# Altium PCB STAND_SSD_2246(CPU).PcbDoc (part 4 of 7)
Units mm, origin at the board's own origin, x right, y up, seen from the top; angles counter-clockwise.
Board outline 70 x 170 mm, 8 copper layers (L1:Top, L2:GND, L3:Sig, L4:VCC, L5:Sig, L6:Sig, L7:GND, L8:Bot), stack 1.112 mm thick; 174 components, 271 nets, 1671 pads, 771 vias.
Unrouted connection lines stored in the file: 138.
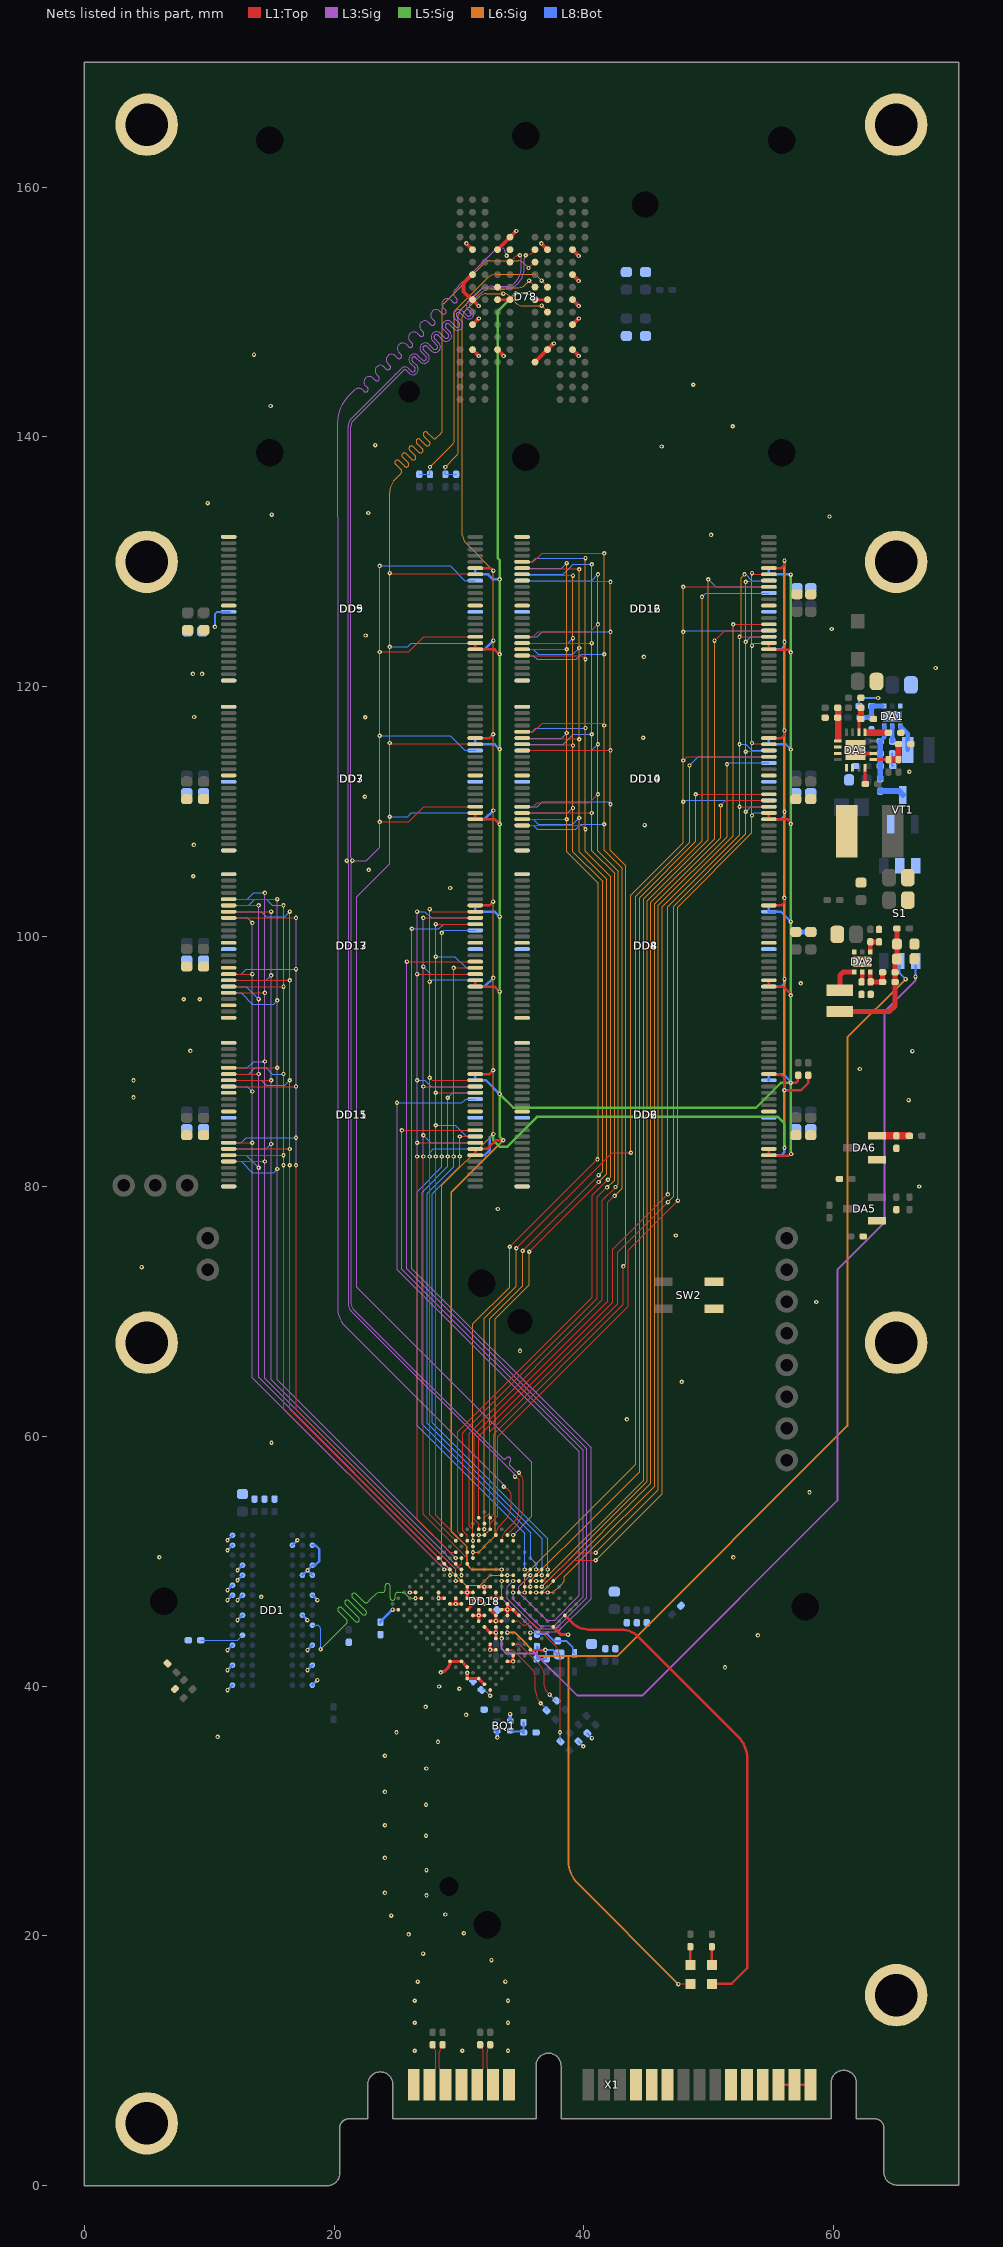
[diagram p10: the nets of this part, all layers, seen from the top]

## Via types
v1: diameter 0.35, hole 0.15, L1:Top to L8:Bot, tented both sides, 722 vias
v2: diameter 0.6, hole 0.3, L1:Top to L8:Bot, tented both sides, 45 vias
v3: diameter 0.6, hole 0.3, L1:Top to L8:Bot, tented bottom, 4 vias

## Nets (pads, with @x,y where several pads share a name; then routed paths per layer and width w, separated by ;. In a path a pad name is that pad's centre, name@x,y a point inside that pad or via, vN(x,y) a via of type N, cw(c..) or ccw(c..) an arc to the next point about the centre after c; other vN are vias at no path point) (continued)
F1DQS_P: D78.E5 DD18.T14 | length 126.6
  L1:Top w0.1: DD18.T14@32.959,52.095 ccw(c32.931,52.123) 32.971,52.123 32.971,52.199 cw(c33.847,52.199) 33.227,52.819 33.721,53.312 ccw(c32.626,54.407) 34.175,54.407 34.175,55.279 ccw(c33.687,55.279) 34.106,55.529 ccw(c33.687,55.279) 34.032,55.624 33.781,55.875 ccw(c33.748,55.842) 33.748,55.888 cw(c33.748,55.935) 33.716,55.902 33.7,55.917 ccw(c33.585,55.802) v1(33.585,55.965) ; v1(33.813,154.502) cw(c34.335,154.502) 33.966,154.871 D78.E5@34.088,154.993
  L3:Sig w0.1: 21.232,143.327 21.115,143.21 21.106,143.201 ccw(c23.063,141.245) 20.296,141.245 20.296,133.599 20.296,70.182 ccw(c22.16,70.182) 20.842,68.864 33.475,56.231 cw(c33.325,56.081) 33.537,56.081 ccw(c33.7,56.081) v1(33.585,55.965) ; 21.232,143.327 21.677,143.772 cw(c21.981,143.468) 22.286,143.772 22.403,143.654 ccw(c22.545,143.795) 22.686,143.937 ; 22.686,143.938 22.521,144.103 cw(c22.824,144.408) 23.09,144.745 23.094,144.745 23.294,144.545 ccw(c23.436,144.686) 23.577,144.828 23.412,144.994 cw(c23.715,145.299) 23.981,145.636 23.985,145.636 24.185,145.436 ccw(c24.327,145.577) 24.468,145.719 ; 24.468,145.72 24.303,145.885 cw(c24.606,146.19) 24.872,146.527 24.876,146.527 25.076,146.327 ccw(c25.218,146.468) 25.359,146.61 ; 25.359,146.611 25.194,146.776 cw(c25.497,147.081) 25.763,147.418 25.767,147.418 25.967,147.218 ccw(c26.109,147.359) 26.25,147.501 26.085,147.667 cw(c26.388,147.971) 26.654,148.309 26.658,148.309 26.858,148.109 ; 26.858,148.109 ccw(c27,148.25) 27.141,148.392 ; 27.141,148.392 26.976,148.558 cw(c27.279,148.862) 27.545,149.2 27.549,149.2 27.749,149 ccw(c27.891,149.141) 28.032,149.283 27.866,149.449 cw(c28.17,149.753) 28.436,150.091 28.44,150.091 28.64,149.891 ccw(c28.782,150.032) 28.923,150.174 ; 28.923,150.174 28.757,150.339 cw(c29.061,150.644) 29.327,150.982 29.331,150.982 29.531,150.782 ccw(c29.673,150.923) 29.814,151.065 29.697,151.182 cw(c30,151.487) 29.696,151.792 ; 29.696,151.792 30.279,152.374 ; 30.279,152.374 30.396,152.491 30.503,152.598 32.933,155.028 cw(c33.27,154.692) 33.27,155.168 33.321,155.168 cw(c33.321,154.785) 33.592,155.055 33.594,155.053 cw(c33.331,154.79) 33.703,154.79 33.703,154.731 ccw(c33.828,154.731) 33.74,154.643 33.765,154.617 cw(c33.65,154.502) v1(33.813,154.502)
F1REN_N: D78.F5 DD18.T13 | length 126.6
  L1:Top w0.1: DD18.T13@33.419,51.635 cw(c34.552,51.635) 33.75,52.436 34.279,52.964 ccw(c32.907,54.336) 34.847,54.336 34.847,56.394 ccw(c34.55,56.394) 34.76,56.604 34.686,56.677 ; D78.F5@34.088,153.993 34.48,154.385 cw(c34.876,153.989) v1(34.876,154.548) ; v1(34.49,56.768) cw(c34.49,56.604) 34.605,56.72 34.621,56.705 ccw(c34.654,56.737) 34.654,56.691 cw(c34.654,56.645) 34.686,56.678
  L3:Sig w0.1: 25.974,145.475 25.94,145.508 25.936,145.508 ccw(c25.67,145.17) 25.366,145.474 24.921,145.029 24.804,144.912 21.399,141.507 ccw(c22.052,140.853) 21.128,140.853 21.128,106.34 cw(c20.94,106.34) 21.073,106.207 21.066,106.2 ccw(c21.181,106.084) v1(21.018,106.084) ccw(c21.181,106.084) 21.066,105.969 cw(c20.916,105.819) 21.128,105.826 cw(c20.916,105.819) 21.128,105.819 21.128,70.605 ccw(c21.899,70.605) 21.354,70.059 34.38,57.033 cw(c34.23,56.883) 34.442,56.883 ccw(c34.605,56.883) v1(34.49,56.768) ; 25.974,145.474 26.171,145.277 ccw(c26.312,145.419) 26.453,145.561 26.113,145.9 ; 26.113,145.901 cw(c26.417,146.205) 26.112,146.509 cw(c26.417,146.205) 26.683,146.543 26.687,146.543 26.72,146.51 ; 26.721,146.509 27.062,146.168 ccw(c27.203,146.31) 27.344,146.168 ; 27.345,146.169 ccw(c27.203,146.31) 27.344,146.452 27.004,146.791 cw(c27.307,147.096) 27.574,147.434 27.578,147.434 27.611,147.401 ; 27.612,147.4 27.953,147.059 ccw(c28.094,147.201) 28.235,147.059 ccw(c28.094,147.201) 28.235,147.343 27.895,147.682 ; 27.895,147.683 cw(c28.198,147.987) 27.894,148.291 cw(c28.198,147.987) 28.465,148.325 28.469,148.325 28.502,148.292 ; 28.503,148.291 28.844,147.95 ccw(c28.985,148.092) 29.126,148.234 28.786,148.573 cw(c29.089,148.878) 28.785,149.182 cw(c29.089,148.878) 29.356,149.216 29.36,149.216 29.393,149.183 ; 29.394,149.182 29.735,148.841 ccw(c29.876,148.983) 30.017,148.841 ccw(c29.876,148.983) 30.017,149.125 ; 30.016,149.125 29.677,149.464 cw(c29.98,149.769) 29.676,150.073 cw(c29.98,149.769) 30.246,150.107 30.251,150.107 30.284,150.074 ; 30.285,150.073 30.626,149.732 ccw(c30.767,149.874) 30.907,150.016 30.712,150.211 cw(c31.016,150.516) 30.712,150.82 31.233,151.341 ; 31.234,151.342 31.35,151.458 31.433,151.542 cw(c32.689,150.286) 32.689,152.062 33.639,152.062 ccw(c33.639,153.329) 34.535,152.433 ccw(c33.423,153.545) 34.996,153.545 34.996,154.258 ccw(c34.738,154.258) 34.92,154.44 cw(c35.029,154.548) v1(34.876,154.548)
F1REN_P: D78.E7 DD3.8 DD5.8 DD7.8 DD9.8 DD18.U13 | length 184.4
  L1:Top w0.1: v1(23.659,109.186) 25.978,109.186 27.191,110.4 DD3.8@31.309,110.4 ; v1(23.659,122.786) 25.978,122.786 27.191,124 DD5.8@31.309,124 ; DD18.U13@33.858,52.12 34.431,52.693 34.491,52.753 ccw(c32.909,54.335) 35.147,54.335 35.147,56.456 ccw(c34.7,56.456) 35.016,56.772 34.898,56.89 cw(c34.931,56.922) 34.885,56.922 ccw(c34.839,56.922) 34.871,56.955 34.856,56.97 cw(c34.971,57.086) v1(34.808,57.086) ; v1(35.346,154.548) ccw(c35.346,155.267) 35.854,154.759 D78.E7@36.088,154.993
  L3:Sig w0.1: v1(23.645,129.684) v1(23.645,116.084) 23.645,107.164 22.565,106.084 v1(21.468,106.084) ; 26.275,146.346 ccw(c26.417,146.205) 26.274,146.065 26.616,145.723 ; 26.275,146.347 cw(c26.417,146.205) 26.559,146.346 26.898,146.007 ccw(c27.203,146.31) 27.507,146.006 ccw(c27.203,146.31) 27.541,146.576 27.541,146.58 27.508,146.613 ; 26.617,145.723 26.65,145.689 26.65,145.685 cw(c26.312,145.419) 26.007,145.116 25.812,145.31 ccw(c25.67,145.17) 25.528,145.311 25.083,144.866 24.966,144.749 21.563,141.346 ccw(c22.057,140.851) 21.358,140.851 21.358,106.34 ccw(c21.546,106.34) 21.413,106.207 21.42,106.2 cw(c21.304,106.084) v1(21.468,106.084) ; 27.45,147.237 ccw(c27.307,147.096) 27.165,146.956 27.507,146.614 ; 27.45,147.237 27.789,146.898 ; 27.789,146.897 ccw(c28.094,147.201) 28.398,146.897 ccw(c28.094,147.201) 28.432,147.467 28.432,147.471 28.398,147.504 ; 28.057,148.128 ccw(c28.198,147.987) 28.056,147.847 28.398,147.505 ; 28.057,148.129 cw(c28.198,147.987) 28.341,148.128 28.68,147.789 ccw(c28.985,148.092) 29.323,148.358 29.323,148.362 29.289,148.395 ; 28.948,149.019 ccw(c29.089,148.878) 28.947,148.737 29.289,148.396 ; 28.948,149.02 cw(c29.089,148.878) 29.232,149.019 ; 29.232,149.019 29.571,148.68 ; 29.571,148.679 ccw(c29.876,148.983) 30.18,148.679 ccw(c29.876,148.983) 30.214,149.249 30.214,149.253 30.18,149.286 ; 29.839,149.91 ccw(c29.98,149.769) 29.838,149.628 30.18,149.287 ; 29.839,149.911 cw(c29.98,149.769) 30.123,149.91 30.462,149.57 ccw(c30.767,149.874) 31.105,150.14 31.105,150.144 31.071,150.177 ; 31.07,150.178 30.875,150.374 cw(c31.016,150.516) 30.875,150.658 31.396,151.179 ; 31.396,151.179 31.513,151.296 31.594,151.377 cw(c32.692,150.279) 32.692,151.832 33.64,151.832 ccw(c33.64,153.326) 34.697,152.269 34.701,152.273 ccw(c33.433,153.541) 35.226,153.541 35.226,154.258 cw(c35.483,154.258) 35.301,154.44 ccw(c35.193,154.548) v1(35.346,154.548) ; v1(34.808,57.086) ccw(c34.693,56.97) 34.693,57.134 cw(c34.693,57.346) 34.543,57.196 34.371,57.367 34.066,57.673 cw(c34.207,57.814) 34.066,57.956 34.1,57.99 ccw(c33.959,58.131) 34.1,58.273 ccw(c33.959,58.131) 33.817,58.273 33.783,58.238 cw(c33.642,58.38) 33.5,58.238 33.465,58.274 21.517,70.221 cw(c21.902,70.606) 21.358,70.606 21.358,105.819 cw(c21.57,105.819) 21.42,105.969 ccw(c21.304,106.084) v1(21.468,106.084)
  L8:Bot w0.1: v1(23.645,116.084) 29.295,116.084 30.479,114.9 DD7.8@31.309,114.9 ; v1(23.645,129.684) 29.295,129.684 30.479,128.5 DD9.8@31.309,128.5
F1WEN: D78.F7 DD3.18 DD5.18 DD7.18 DD9.18 DD18.U12 | length 153.3
  L1:Top w0.1: v1@24.449,129.06 DD5.18@31.199,129.06 ; v1@24.509,115.45 DD3.18@31.259,115.45 ; DD18.U12@34.338,51.635 v1(34.338,52.095) ; v1(35.57,153.526) D78.F7@36.037,153.993
  L3:Sig w0.1: v1(24.459,129.1) v1(24.459,123.2) 24.459,105.843 21.819,103.203 21.819,71.927 35.835,57.911 35.835,53.592 v1(34.338,52.095)
  L6:Sig w0.1: v1(24.459,129.1) 24.459,135.588 cw(c25.9,135.588) 24.881,136.607 25.327,137.053 25.363,137.089 ccw(c25.221,137.23) 25.363,137.371 24.924,137.811 cw(c25.065,137.952) 24.924,138.093 cw(c25.065,137.952) 25.206,138.093 25.651,137.648 ccw(c25.793,137.79) 25.934,137.648 ccw(c25.793,137.79) 25.934,137.931 25.489,138.376 cw(c25.631,138.518) 25.489,138.659 cw(c25.631,138.518) 25.772,138.659 26.217,138.214 ccw(c26.359,138.355) 26.5,138.214 ccw(c26.359,138.355) 26.5,138.497 26.055,138.942 cw(c26.196,139.083) 26.055,139.225 cw(c26.196,139.083) 26.338,139.225 26.783,138.78 ccw(c26.924,138.921) 27.066,138.78 ccw(c26.924,138.921) 27.066,139.063 26.621,139.508 cw(c26.762,139.649) 26.621,139.791 cw(c26.762,139.649) 26.903,139.791 27.349,139.345 ccw(c27.49,139.487) 27.631,139.345 ccw(c27.49,139.487) 27.631,139.628 27.186,140.073 cw(c27.328,140.215) 27.186,140.356 cw(c27.328,140.215) 27.469,140.356 27.908,139.917 ccw(c28.05,140.058) 28.191,139.917 28.529,140.255 28.557,140.283 ccw(c28.296,140.545) 28.666,140.545 28.666,150.349 cw(c29.173,150.349) 28.814,150.708 32.03,153.924 cw(c32.468,153.486) 32.468,154.105 34.759,154.105 cw(c34.759,153.546) 35.154,153.941 v1(35.57,153.526)
  L8:Bot w0.1: v1(24.459,109.6) 25.884,109.6 26.184,109.9 DD7.18@31.309,109.9 ; v1(24.459,123.2) 25.884,123.2 26.184,123.5 DD9.18@31.309,123.5
  other v1: 24.459,115.5
F2ALE: DD10.17 DD12.17 DD14.17 DD16.17 DD18.T16 | length 91.6
  L1:Top w0.1: DD18.T16@32.04,53.014 32.04,53.474 32.453,53.887 32.453,60.362 42.708,70.616 42.708,74.735 v1(46.721,78.748) ; v1@52.999,128.43 DD12.17@54.754,128.43 ; v1@53.019,114.84 DD10.17@54.774,114.84
  L6:Sig w0.1: v1(46.721,78.748) 47.184,79.21 47.184,102.449 52.959,108.224 v1(52.959,114.8) v1(52.959,123.6) v1(52.959,128.4)
  L8:Bot w0.1: v1(52.959,110) 53.359,110.4 DD14.17@54.814,110.4 ; v1(52.959,123.6) 53.359,124 DD16.17@54.814,124
F2CE0: DD10.9 DD18.R5 | length 73.5
  L1:Top w0.1: DD18.R5@36.636,47.499 v1(37.096,47.499) ; v1(50.959,110.5) 51.359,110.9 DD10.9@54.814,110.9
  L6:Sig w0.1: v1(37.096,47.499) 37.555,47.499 38.149,48.093 38.436,48.379 38.436,48.776 40.84,51.179 45.665,56.004 45.665,102.627 50.959,107.921 v1(50.959,110.5)
F2CE1: DD12.9 DD18.P6 | length 87.5
  L1:Top w0.1: DD18.P6@35.717,47.499 v1(36.176,47.499) ; v1(50.459,123.7) 51.259,124.5 DD12.9@54.814,124.5
  L6:Sig w0.1: v1(36.176,47.499) 36.636,47.499 37.69,48.552 45.369,56.231 45.369,102.755 50.459,107.846 v1(50.459,123.7)
F2CE2: DD10.10 DD18.P7 | length 75.2
  L1:Top w0.1: DD18.P7@35.257,47.958 35.718,47.958 v1(35.72,47.96) ; v1(48.959,111.4) DD10.10@54.814,111.4
  L6:Sig w0.1: v1(35.72,47.96) 35.717,47.963 35.717,48.418 36.961,49.662 39.778,52.479 44.462,57.163 44.462,103.122 48.959,107.618 v1(48.959,111.4)
F2CE3: DD12.10 DD18.U5 | length 86.4
  L1:Top w0.1: DD18.U5@37.555,48.418 38.093,48.955 39.217,50.079 v1(40.94,50.079) ; v1(51.959,125) DD12.10@54.814,125
  L6:Sig w0.1: v1(40.94,50.079) 46.269,55.409 46.269,102.383 51.959,108.073 v1(51.959,125)
F2CE4: DD14.9 DD18.N7 | length 78.8
  L1:Top w0.1: DD18.N7@34.797,47.499 v1(35.257,47.499)
  L6:Sig w0.1: v1(35.257,47.499) 35.257,48.878 35.334,48.954 44.149,57.769 44.149,103.232 48.459,107.543 v1(48.459,113.7)
  L8:Bot w0.1: v1(48.459,113.7) 49.159,114.4 DD14.9@54.814,114.4
F2CE5: DD16.9 DD18.R6 | length 91.7
  L1:Top w0.1: DD18.R6@36.176,47.958 v1(36.636,47.958)
  L6:Sig w0.1: v1(36.636,47.958) 38.12,49.443 38.174,49.496 40.557,51.879 45.065,56.387 45.065,102.876 49.959,107.77 v1(49.959,128.6)
  L8:Bot w0.1: v1(49.959,128.6) 50.559,128 DD16.9@54.814,128
F2CE6: DD14.10 DD18.T6 | length 76.1
  L1:Top w0.1: DD18.T6@36.636,48.418 37.096,48.418 37.863,49.185 38.174,49.496 39.357,50.679 v1(40.94,50.679)
  L6:Sig w0.1: v1(40.94,50.679) 40.921,50.679 45.967,55.726 45.967,102.505 51.459,107.997 v1(51.459,113.8)
  L8:Bot w0.1: v1(51.459,113.8) 51.559,113.9 DD14.10@54.814,113.9
F2CE7: DD16.10 DD18.R7 | length 90.5
  L1:Top w0.1: DD18.R7@35.717,48.418 v1(36.177,48.417)
  L6:Sig w0.1: v1(36.177,48.417) 36.695,48.418 44.777,56.5 44.777,103.012 49.459,107.694 v1(49.459,127.2)
  L8:Bot w0.1: v1(49.459,127.2) 49.759,127.5 DD16.10@54.814,127.5
F2CLE: DD10.16 DD12.16 DD14.16 DD16.16 DD18.R15 | length 111
  L1:Top w0.1: v1(32.036,52.559) 32.036,52.099 DD18.R15@32.04,52.095 ; v1@34.602,75.043 42.259,82.7 v1(43.759,82.7) ; v1(47.959,114.1) 48.259,114.4 DD10.16@54.814,114.4 ; v1(47.959,128) DD12.16@54.814,128
  L6:Sig w0.1: v1(32.036,52.559) 32.042,52.559 32.042,69.469 34.595,72.022 v1(34.595,75.051) ; v1(43.759,82.7) 43.759,103.299 47.959,107.499 v1(47.959,124.4) v1(47.959,128)
  L8:Bot w0.1: v1(47.959,110.8) 48.059,110.9 DD14.16@54.814,110.9 ; v1(47.959,124.4) 48.059,124.5 DD16.16@54.814,124.5
F2D0: DD10.29 DD12.29 DD14.29 DD16.29 DD18.R16 | length 111.3
  L1:Top w0.1: DD18.R16@31.58,52.554 31.58,53.014 31.22,53.374 31.22,60.113 41.912,70.804 41.912,78.723 v1@42.451,79.262 ; DD10.29@35.064,116.4 35.959,116.4 36.659,117.1 41.429,117.1 v1(41.629,116.9) ; DD12.29@35.064,130 35.959,130 36.659,130.7 v1@41.629,130.7
  L6:Sig w0.1: v1(41.629,130.68) v1(41.629,122.6) 41.629,106.896 43.068,105.457 43.068,79.856 v1(42.463,79.251)
  L8:Bot w0.1: DD14.29@35.064,108.9 35.959,108.9 36.259,108.6 39.368,108.6 39.768,109 v1(41.629,109) ; DD16.29@35.064,122.5 35.959,122.5 36.259,122.2 39.377,122.2 39.777,122.6 v1(41.629,122.6)
F2D1: DD10.30 DD12.30 DD14.30 DD16.30 DD18.M14 | length 103.7
  L1:Top w0.1: DD18.M14@31.12,50.256 v1(31.12,50.716) ; DD10.30@35.064,115.9 DD10.30@35.089,115.875 ; DD12.30@35.064,129.5 DD12.30@35.089,129.475 ; DD10.30@35.089,115.825 v1@39.629,115.825 ; DD12.30@35.089,129.445 v1@39.629,129.445 ; v1@35.64,74.781 v1@41.159,80.3
  L6:Sig w0.1: v1(31.12,50.716) 31.58,50.716 31.905,51.041 32.365,51.501 32.365,51.509 32.904,52.048 32.904,69.421 35.632,72.149 v1(35.632,74.774) ; v1(39.629,129.4) v1(39.629,123.1) 39.629,106.79 41.821,104.598 41.821,80.998 v1(41.183,80.36)
  L8:Bot w0.1: DD14.30@35.064,109.4 35.959,109.4 36.359,109 39.129,109 v1(39.629,109.5) ; DD16.30@35.064,123 35.959,123 36.359,122.6 39.129,122.6 v1(39.629,123.1)
  other v1: 39.629,115.8
F2D2: DD10.31 DD12.31 DD14.31 DD16.31 DD18.P15 | length 99.2
  L1:Top w0.1: DD18.P15@31.58,51.635 v1(31.58,52.095) ; DD12.31@35.064,128.94 v1@39.129,128.94 ; DD10.31@35.094,115.35 v1@39.141,115.35 ; v1@35.106,74.847 41.173,80.913 v1@41.159,80.913
  L6:Sig w0.1: v1(31.58,52.095) 32.032,52.095 32.455,52.519 32.455,69.395 35.1,72.039 v1(35.1,74.853) ; v1(39.129,128.9) v1(39.129,123.9) 39.129,106.793 41.498,104.424 41.498,81.227 v1(41.183,80.912)
  L8:Bot w0.1: DD14.31@35.064,109.9 38.729,109.9 v1(39.129,110.3) ; DD16.31@35.064,123.5 38.729,123.5 v1(39.129,123.9)
  other v1: 39.129,115.3
F2D3: DD10.32 DD12.32 DD14.32 DD16.32 DD18.U16 | length 108.7
  L1:Top w0.1: DD18.U16@32.499,53.474 32.784,53.758 32.784,60.181 43.159,70.556 v1(43.159,73.6) ; DD10.32@35.064,114.9 v1@42.171,114.9 ; DD12.32@35.064,128.45 v1@42.155,128.45
  L6:Sig w0.1: v1@42.129,124.37 v1(42.129,128.4) ; v1(42.129,124.4) v1(42.129,114.91) v1(42.129,110.6) 42.129,106.904 43.359,105.674 43.359,73.8 v1(43.159,73.6)
  L8:Bot w0.1: DD14.32@35.064,110.4 36.259,110.4 36.659,110.8 41.929,110.8 v1(42.129,110.6) ; DD16.32@35.064,124 36.259,124 36.659,124.4 v1(42.129,124.4)
F2D4: DD10.41 DD12.41 DD14.41 DD16.41 DD18.P16 | length 108.2
  L1:Top w0.1: DD18.P16@31.12,52.095 31.12,52.554 30.82,52.854 30.82,60.258 41.487,70.924 41.487,78.905 v1(42.534,79.952) ; DD10.41@35.064,110.4 35.959,110.4 36.259,110.7 40.429,110.7 v1(41.129,111.4) ; DD12.41@35.064,124 35.959,124 36.348,124.389 40.518,124.389 v1(41.129,125)
  L6:Sig w0.1: v1(41.129,129) v1(41.129,125) v1(41.129,111.4) 41.129,106.872 42.759,105.242 42.759,80.177 v1(42.534,79.952)
  L8:Bot w0.1: DD14.41@35.064,114.9 40.629,114.9 v1(41.129,115.4) ; DD16.41@35.064,128.5 40.629,128.5 v1(41.129,129)
F2D5: DD10.42 DD12.42 DD14.42 DD16.42 DD18.N16 | length 107
  L1:Top w0.1: DD18.N16@30.661,51.635 30.661,52.095 30.32,52.435 30.32,60.286 41.08,71.045 41.08,79.162 41.848,79.93 v1(41.864,79.93) ; DD10.42@35.064,109.9 v1(40.629,109.9) ; DD12.42@35.064,123.5 v1(40.629,123.5)
  L6:Sig w0.1: v1(40.629,129.8) v1(40.629,123.5) 40.629,106.88 42.453,105.056 42.453,80.508 41.876,79.93 v1(41.864,79.93)
  L8:Bot w0.1: DD14.42@35.064,115.4 38.367,115.4 39.167,116.2 v1(40.629,116.2) ; DD16.42@35.064,129 38.336,129 39.136,129.8 v1(40.629,129.8)
F2D6: DD10.43 DD12.43 DD14.43 DD16.43 DD18.N15 | length 98.5
  L1:Top w0.1: DD18.N15@31.12,51.176 v1(31.12,51.635) ; v1@34.073,75.165 v1@41.083,82.175 ; DD10.43@35.064,109.4 v1(38.629,109.4) ; DD12.43@35.064,123 v1(38.629,123)
  L6:Sig w0.1: v1(31.12,51.635) 31.12,68.998 34.068,71.945 v1(34.068,75.171) ; v1(38.629,129.9) v1(38.629,123) 38.629,106.78 41.137,104.272 v1@41.137,82.173
  L8:Bot w0.1: DD14.43@35.064,115.9 38.229,115.9 v1(38.629,116.3) ; DD16.43@35.064,129.5 38.229,129.5 v1(38.629,129.9)
  other v1: 41.086,82.173
F2D7: DD10.44 DD12.44 DD14.44 DD16.44 DD18.N17 | length 105
  L1:Top w0.1: DD18.N17@30.201,52.095 29.92,52.376 29.92,60.381 40.683,71.143 40.683,79.293 v1@41.959,80.57 ; DD10.44@35.064,108.9 39.829,108.9 v1(40.129,108.6) ; DD12.44@35.064,122.5 39.829,122.5 v1(40.129,122.2)
  L6:Sig w0.1: v1(40.129,130.3) v1(40.129,122.2) v1(40.129,108.6) 40.129,106.819 42.144,104.804 42.144,80.759 v1(41.926,80.541)
  L8:Bot w0.1: DD14.44@35.064,116.4 35.859,116.4 36.159,116.7 v1(40.129,116.7) ; DD16.44@35.064,130 35.859,130 36.159,130.3 v1(40.129,130.3)
F2REN_P: DD10.8 DD12.8 DD14.8 DD16.8 DD18.T17 | length 94.1
  L1:Top w0.1: DD18.T17@31.58,53.474 31.58,60.014 42.314,70.748 42.314,74.987 v1@46.705,79.377 ; v1(52.459,110.4) DD10.8@54.814,110.4 ; v1(52.459,124) DD12.8@54.814,124
  L6:Sig w0.1: v1(46.721,79.362) 46.721,102.41 52.459,108.149 v1(52.459,124) 52.584,124.125 52.584,128.725 v1(52.859,129)
  L8:Bot w0.1: v1(52.459,115.4) 52.959,115.4 53.459,114.9 DD14.8@54.814,114.9 ; v1(52.859,129) 52.759,129 52.859,129.1 53.459,128.5 DD16.8@54.814,128.5
F2WEN: DD10.18 DD12.18 DD14.18 DD16.18 DD18.T15 | length 90.7
  L1:Top w0.1: DD18.T15@32.499,52.554 32.499,53.042 33.09,53.633 33.09,59.951 43.543,70.404 43.543,74.9 v1@47.517,78.874 ; v1(53.459,129.1) 53.559,129 DD12.18@54.814,129 ; v1@53.519,115.44 DD10.18@54.774,115.44
  L6:Sig w0.1: v1@47.528,78.876 47.528,102.368 53.459,108.3 v1(53.459,123.3) v1(53.459,129.1)
  L8:Bot w0.1: v1(53.459,109.7) 53.659,109.9 DD14.18@54.814,109.9 ; v1(53.459,123.3) 53.659,123.5 DD16.18@54.814,123.5
  other v1: 47.521,78.869 53.459,115.5
F3ALE: DD11.17 DD13.17 DD15.17 DD17.17 DD18.L14 | length 70.3
  L1:Top w0.1: v1(27.154,82.4) 27.154,53.763 30.661,50.256 DD18.L14@30.661,49.797 ; v1(27.154,88) DD11.17@31.309,88 ; v1(27.154,101.5) DD13.17@31.309,101.5
  L3:Sig w0.1: v1(27.154,82.4) v1(27.154,88) v1(27.154,97.6) v1(27.154,101.5)
  L8:Bot w0.1: v1(27.154,84.1) 27.754,83.5 DD15.17@31.309,83.5 ; v1(27.154,97.6) 27.754,97 DD17.17@31.309,97
F3CE0: DD11.9 DD18.U6 | length 41.2
  L1:Top w0.1: v1@30.034,84 DD11.9@31.309,84 ; DD18.U6@37.096,48.877 v1(37.096,49.337)
  L3:Sig w0.1: v1(30.059,82.4) v1(30.059,84)
  L8:Bot w0.1: v1(30.059,82.4) 30.067,82.392 30.067,81.635 27.85,79.417 27.85,61.092 37.126,51.816 v1@37.126,49.306
F3CE1: DD13.9 DD18.T7 | length 55.5
  L1:Top w0.1: v1(29.574,97.5) DD13.9@31.309,97.5 ; DD18.T7@36.176,48.877 v1(36.636,48.877)
  L3:Sig w0.1: v1(29.574,82.4) v1(29.574,97.5)
  L8:Bot w0.1: v1(29.574,82.4) 29.574,81.58 27.453,79.459 27.453,61.029 36.667,51.816 36.667,48.907 v1(36.636,48.877)
F3CE2: DD11.10 DD18.N8 | length 57.6
  L1:Top w0.1: v1@25.434,84.5 DD11.10@31.309,84.5 ; v1(34.338,47.499) DD18.N8@34.338,47.958
  L3:Sig w0.1: v1(25.434,84.49) 25.434,73.377 39.931,58.88 39.931,47.154 37.62,44.843 36.458,44.843 34.338,46.963 v1(34.338,47.499)
F3CE3: DD13.10 DD18.P8 | length 72.9
  L1:Top w0.1: v1(25.829,98) DD13.10@31.309,98 ; v1(34.338,48.418) DD18.P8@34.797,48.418
  L3:Sig w0.1: v1(25.829,98) 25.829,73.417 40.248,58.998 40.248,47.07 37.761,44.583 36.28,44.583 33.878,46.985 33.878,47.958 v1(34.338,48.418)
F3CE4: DD15.9 DD18.U7 | length 45.2
  L1:Top w0.1: v1(36.176,49.337) DD18.U7@36.636,49.337
  L3:Sig w0.1: v1(29.104,82.4) v1(29.104,87.1)
  L8:Bot w0.1: v1(29.104,82.4) 29.104,81.599 27.053,79.548 27.053,60.97 35.747,52.275 35.747,50.226 36.176,49.797 v1(36.176,49.337) ; v1(29.104,87.1) 29.504,87.5 DD15.9@31.309,87.5
F3CE5: DD17.9 DD18.N9 | length 76
  L1:Top w0.1: v1(33.419,48.418) DD18.N9@33.878,48.418
  L3:Sig w0.1: v1(26.229,100.635) 26.229,73.427 40.585,59.071 40.585,47.008 37.92,44.343 36.115,44.343 33.419,47.039 v1(33.419,48.418)
  L8:Bot w0.1: v1@26.229,100.625 28.394,100.625 28.769,101 DD17.9@31.309,101
F3CE6: DD15.10 DD18.R8 | length 60.6
  L1:Top w0.1: DD18.R8@35.257,48.877 v1(35.717,48.877)
  L3:Sig w0.1: v1(25.044,86.7) 25.044,73.343 39.637,58.75 39.637,47.256 37.661,45.281 37.015,45.281 36.501,45.795 35.851,46.445 35.582,46.714 35.392,46.904 35.122,47.174 34.797,47.499 34.797,47.958 35.62,48.781 v1@35.62,48.843
  L8:Bot w0.1: v1(25.044,86.7) 30.241,86.7 30.541,87 DD15.10@31.309,87
F3CE7: DD17.10 DD18.T8 | length 58.6
  L1:Top w0.1: v1(35.257,49.337) DD18.T8@35.717,49.337
  L3:Sig w0.1: v1(28.624,82.4) v1(28.624,100.3)
  L8:Bot w0.1: v1(28.624,82.4) 28.624,81.558 26.648,79.582 26.648,60.854 35.257,52.245 v1(35.257,49.337) ; v1(28.624,100.3) 28.824,100.5 DD17.10@31.309,100.5
F3CLE: DD11.16 DD13.16 DD15.16 DD17.16 DD18.M15 | length 64.8
  L1:Top w0.1: v1(28.144,82.4) 28.144,53.692 30.661,51.176 DD18.M15@30.661,50.716 ; v1(28.144,87.5) DD11.16@31.309,87.5 ; v1(28.144,101) DD13.16@31.309,101
  L3:Sig w0.1: v1@28.144,82.37 v1(28.144,82.4) v1(28.144,87.5) v1(28.144,98.4) v1(28.144,101)
  L8:Bot w0.1: v1(28.144,84.9) 29.692,84.9 30.592,84 DD15.16@31.309,84 ; v1(28.144,98.4) 29.675,98.4 30.575,97.5 DD17.16@31.309,97.5
F3D0: DD11.29 DD13.29 DD15.29 DD17.29 DD18.K15 | length 75.7
  L1:Top w0.1: DD11.29@11.559,89.5 v1(15.459,89.5) ; DD13.29@11.559,103 v1@15.459,103 ; DD18.K15@29.742,49.797 v1(29.742,50.256)
  L3:Sig w0.1: v1(15.459,103) v1(15.459,94.9) v1(15.459,81.4) 15.459,64.539 27.919,52.079 28.204,51.794 v1(29.742,50.256)
  L8:Bot w0.1: DD15.29@11.559,82 12.559,82 13.459,81.1 15.159,81.1 v1(15.459,81.4) ; DD17.29@11.559,95.5 12.559,95.5 13.459,94.6 15.159,94.6 v1(15.459,94.9)
F3D1: DD11.30 DD13.30 DD15.30 DD17.30 DD18.J14 | length 70.9
  L1:Top w0.1: DD11.30@11.559,89 v1(13.959,89) ; DD13.30@11.559,102.5 v1(13.959,102.5) ; v1(29.282,48.877) DD18.J14@29.742,48.877
  L3:Sig w0.1: v1(13.959,102.5) v1(13.959,95) v1(13.959,89) v1(13.959,81.5) 13.953,81.494 13.953,64.71 29.282,49.381 v1(29.282,48.877)
  L8:Bot w0.1: DD15.30@11.559,82.5 12.959,82.5 v1(13.959,81.5) ; DD17.30@11.559,96 12.959,96 v1(13.959,95)
F3D2: DD11.31 DD13.31 DD15.31 DD17.31 DD18.K14 | length 73.8
  L1:Top w0.1: DD11.31@11.559,88.5 v1(14.959,88.5) ; DD13.31@11.559,102 v1(14.959,102) ; v1(30.201,48.877) DD18.K14@30.201,49.337
  L3:Sig w0.1: v1(14.959,102) v1(14.959,96.9) v1(14.959,83.4) 14.959,64.531 27.711,51.779 30.201,49.289 v1(30.201,48.877)
  L8:Bot w0.1: DD15.31@11.559,83 14.559,83 v1(14.959,83.4) ; DD17.31@11.559,96.5 14.559,96.5 v1(14.959,96.9)
F3D3: DD11.32 DD13.32 DD15.32 DD17.32 DD18.L15 | length 80.4
  L1:Top w0.1: DD11.32@11.559,88 v1(16.959,88) ; DD13.32@11.559,101.5 v1(16.959,101.5) ; v1(16.959,81.7) 16.959,62.124 29.621,49.462 29.867,49.462 30.201,49.797 DD18.L15@30.201,50.256
  L3:Sig w0.1: v1(16.959,81.7) v1(16.959,83.9) v1(16.959,97.4) v1(16.959,101.5)
  L8:Bot w0.1: DD15.32@11.559,83.5 12.559,83.5 12.959,83.9 v1(16.959,83.9) ; DD17.32@11.559,97 12.559,97 12.959,97.4 v1(16.959,97.4)
F3D4: DD11.41 DD13.41 DD15.41 DD17.41 DD18.J15 | length 66.5
  L1:Top w0.1: DD11.41@11.559,83.5 v1(13.459,83.5) ; DD13.41@11.559,97 v1(13.459,97) ; v1(28.822,49.337) DD18.J15@29.282,49.337
  L3:Sig w0.1: v1(13.459,101.1) v1(13.459,97) v1(13.459,87.6) v1(13.459,83.5) 13.465,83.494 13.465,64.695 v1(28.822,49.337)
  L8:Bot w0.1: DD15.41@11.559,88 13.059,88 v1(13.459,87.6) ; DD17.41@11.559,101.5 13.059,101.5 v1(13.459,101.1)
F3D5: DD11.42 DD13.42 DD15.42 DD17.42 DD18.J17 | length 76.9
  L1:Top w0.1: DD11.42@11.559,83 v1(16.459,83) ; DD13.42@11.559,96.5 v1(16.459,96.5) ; v1(16.459,81.7) 16.459,62.16 DD18.J17@28.363,50.256
  L3:Sig w0.1: v1(16.459,81.7) v1(16.459,83) v1(16.459,96.5) v1(16.459,102)
  L8:Bot w0.1: DD15.42@11.559,88.5 14.159,88.5 14.559,88.1 16.059,88.1 v1(16.459,88.5) ; DD17.42@11.559,102 14.159,102 14.559,101.6 16.059,101.6 v1(16.459,102)
F3D6: DD11.43 DD13.43 DD15.43 DD17.43 DD18.J16 | length 76.7
  L1:Top w0.1: DD11.43@11.559,82.5 v1(15.959,82.5) ; DD13.43@11.559,96 v1(15.959,96) ; v1(15.959,81.7) 15.959,62.208 28.37,49.797 DD18.J16@28.822,49.797
  L3:Sig w0.1: v1(15.959,81.7) v1(15.959,82.5) v1(15.959,96) v1(15.959,102.5)
  L8:Bot w0.1: DD15.43@11.559,89 13.159,89 13.659,89.5 14.559,89.5 15.059,89 v1(15.959,89) ; DD17.43@11.559,102.5 13.159,102.5 13.659,103 14.559,103 15.059,102.5 v1(15.959,102.5)
F3D7: DD11.44 DD13.44 DD15.44 DD17.44 DD18.J13 | length 73.9
  L1:Top w0.1: DD11.44@11.559,82 v1(14.459,82) ; DD13.44@11.559,95.5 v1(14.459,95.5) ; v1(29.742,48.418) DD18.J13@30.201,48.418
  L3:Sig w0.1: v1(14.459,103.5) v1(14.459,95.5) v1(14.459,82) 14.459,64.631 27.611,51.479 27.75,51.34 27.856,51.235 29.742,49.349 v1(29.742,48.418)
  L8:Bot w0.1: DD15.44@11.559,89.5 13.059,89.5 13.559,90 v1(14.459,90) ; DD17.44@11.559,103 13.059,103 13.559,103.5 v1(14.459,103.5)
F3REN_P: DD11.8 DD13.8 DD15.8 DD17.8 DD18.L16 | length 72
  L1:Top w0.1: v1@26.556,83.5 DD11.8@31.309,83.5 ; v1(26.654,82.4) 26.654,53.344 29.283,50.716 DD18.L16@29.742,50.716 ; v1(26.654,97) DD13.8@31.309,97
  L3:Sig w0.1: v1(26.654,82.4) v1(26.654,97) v1(26.654,102)
  L8:Bot w0.1: v1(26.654,88.5) 27.269,88.5 27.769,88 DD15.8@31.309,88 ; v1(26.654,102) 27.263,102 27.763,101.5 DD17.8@31.309,101.5
  other v1: 26.654,83.5
F3WEN: DD11.18 DD13.18 DD15.18 DD17.18 DD18.M17 | length 66.5
  L1:Top w0.1: v1(27.654,82.4) 27.644,82.389 27.644,53.733 DD18.M17@29.742,51.635 ; v1(27.654,88.7) 27.854,88.5 DD11.18@31.309,88.5 ; v1(27.654,102.2) 27.854,102 DD13.18@31.309,102
  L3:Sig w0.1: v1(27.654,82.4) v1(27.654,96.4) v1(27.654,102.2)
  L8:Bot w0.1: v1(27.654,82.4) 27.654,82.704 27.95,83 DD15.18@31.309,83 ; v1(27.654,96.4) 27.677,96.4 27.838,96.561 DD17.18@31.05,96.561 ; DD17.18@31.271,96.538 DD17.18@31.309,96.5
FRB: D78.J4 D78.J5 D78.J7 D78.J8 DD2.6 DD2.7 DD3.6 DD3.7 DD4.6 DD4.7 DD5.6 DD5.7 DD6.6 DD6.7 DD7.6 DD7.7 DD8.6 DD8.7 DD9.6 DD9.7 DD10.6 DD10.7 DD11.6 DD11.7 DD12.6 DD12.7 DD13.6 DD13.7 DD14.6 DD14.7 DD15.6 DD15.7 DD16.6 DD16.7 DD17.6 DD17.7 DD18.N10 R26.1 | length 226
  L1:Top w0.1: DD18.N10@33.419,48.877 v1(33.419,49.337) ; D78.J5@34.088,151.044 v1(34.556,151.511) ; v1(35.621,151.511) D78.J7@36.088,151.044
  L1:Top w0.2: DD11.6@31.309,82.5 DD11.7@31.309,83 32.259,83 32.959,83.7 v1(33.559,83.7) ; DD13.7@31.309,96.5 DD13.6@31.309,96 32.859,96 v1(33.259,95.6) ; DD3.7@31.309,109.9 DD3.6@31.309,109.4 32.859,109.4 v1(33.259,109) ; DD5.7@31.309,123.5 DD5.6@31.309,123 32.859,123 v1(33.259,122.6) ; D78.J4@33.088,150.993 D78.J5@34.088,150.993 ; D78.J7@36.088,150.993 D78.J8@37.088,150.993 ; DD2.7@54.809,83 DD2.6@54.809,82.5 54.828,82.481 55.374,82.481 55.384,82.471 56.407,82.471 56.536,82.6 v1(56.59,82.6) ; DD4.7@54.809,96.5 DD4.6@54.809,96 55.959,96 56.559,95.4 v1(56.559,95.3) ; DD10.7@54.814,109.9 DD10.6@54.814,109.4 54.833,109.381 55.379,109.381 56.332,109.381 56.521,109.192 56.521,109.063 v1(56.559,109.025) ; DD12.7@54.814,123.5 DD12.6@54.814,123 54.833,122.981 55.379,122.981 55.394,122.966 56.342,122.966 56.554,122.754 v1(56.559,122.754) ; v1(56.559,88.3) 56.99,88.3 57.131,88.442 57.131,88.872 R26.1@57.159,88.9
  L5:Sig w0.2: v1(33.559,83.7) 33.259,84 v1(33.259,87.4) ; v1(35.621,151.511) v1(34.556,151.511) 33.112,150.068 33.112,130.281 33.259,130.134 v1(33.259,122.6) v1(33.259,115) v1(33.259,109) v1(33.259,101.6) v1(33.259,95.6) v1(33.259,87.4) ; v1(56.559,128.975) v1(56.559,122.754) v1(56.559,114.975) v1(56.559,109.025) v1(56.559,101.2) v1(56.559,95.3) v1(56.559,88.3) ; v1(56.59,82.6) 56.59,82.531 56.559,82.562 v1(56.559,88.3) ; v1(33.259,87.4) 34.359,86.3 53.777,86.3 55.777,88.3 v1(56.559,88.3)
  L6:Sig w0.15: v1(33.419,49.337) 31.038,49.337 30.62,49.755 30.62,51.177 29.383,52.414 29.383,79.524 v1(33.559,83.7)
  L8:Bot w0.2: DD15.6@31.309,89 DD15.7@31.309,88.5 32.159,88.5 v1(33.259,87.4) ; DD17.6@31.309,102.5 DD17.7@31.309,102 32.859,102 v1(33.259,101.6) ; DD7.6@31.309,115.9 DD7.7@31.309,115.4 32.859,115.4 v1(33.259,115) ; DD9.6@31.309,129.5 DD9.7@31.309,129 32.334,129 32.734,128.6 v1(33.259,128.6) ; DD6.7@54.814,88.5 DD6.6@54.814,89 55.959,89 56.559,88.4 v1(56.559,88.3) ; DD8.6@54.814,102.5 DD8.7@54.814,102 55.759,102 v1(56.559,101.2) ; DD14.6@54.814,115.9 DD14.7@54.814,115.4 56.163,115.4 56.559,115.004 v1(56.559,114.975) ; DD16.6@54.814,129.5 DD16.7@54.814,129 v1@56.459,129
FWP: D78.H4 D78.K8 DD2.19 DD3.19 DD4.19 DD5.19 DD6.19 DD7.19 DD8.19 DD9.19 DD10.19 DD11.19 DD12.19 DD13.19 DD14.19 DD15.19 DD16.19 DD17.19 DD18.P9 R25.1 | length 223.4
  L1:Top w0.1: D78.H4@33.088,151.942 v1(33.556,151.475) ; v1(33.878,48.878) DD18.P9@34.338,48.877 ; v1(36.621,150.511) D78.K8@37.088,150.044
  L1:Top w0.2: DD11.19@31.309,89 32.439,89 v1(32.739,89.3) ; DD13.19@31.309,102.5 32.439,102.5 v1(32.739,102.8) ; DD3.19@31.309,115.9 32.439,115.9 v1(32.739,116.2) ; DD5.19@31.309,129.5 32.54,129.5 32.74,129.3 v1(32.759,129.3) ; DD2.19@54.809,89 55.754,89 56.054,88.7 v1(56.054,87.7) 57.375,87.7 57.959,88.285 R25.1@57.959,88.9 ; DD4.19@54.809,102.5 55.801,102.5 56.054,102.754 v1(56.054,103.1) ; DD10.19@54.814,115.9 55.806,115.9 56.059,116.154 v1(56.059,116.5) ; DD12.19@54.814,129.5 55.806,129.5 56.059,129.754 v1(56.059,130.1)
  L5:Sig w0.2: v1(32.759,84.2) 32.759,83.689 33.278,83.171 33.831,83.171 36.236,85.575 55.527,85.575 56.059,85.043 v1(56.059,83.1)
  L6:Sig w0.1: v1(33.878,48.878) 32.499,48.878 31.687,48.066 30.554,48.066 28.642,49.977 28.642,80.083 32.459,83.9 v1(32.759,84.2) v1(32.759,123.7) v1(32.759,129.3) 30.541,131.518 cw(c31.17,132.147) 30.281,132.147 30.281,149.628 cw(c30.832,149.628) 30.442,150.017 31.709,151.284 cw(c32.169,150.823) 32.169,151.475 v1(33.556,151.475) 33.582,151.475 cw(c33.582,150.856) 34.02,151.294 34.646,150.668 ccw(c35.023,151.045) 35.023,150.511 v1(36.621,150.511) v1@36.621,150.536
  L6:Sig w0.2: v1(56.059,83.1) v1(56.059,96.6) v1(56.059,110) v1(56.059,123.6) v1(56.059,130.1)
  L8:Bot w0.2: DD15.19@31.309,82.5 32.059,82.5 32.483,82.924 32.483,83.924 v1(32.759,84.2) ; DD17.19@31.309,96 32.059,96 v1(32.759,96.7) ; DD7.19@31.309,109.4 32.059,109.4 v1(32.759,110.1) ; DD9.19@31.309,123 32.059,123 v1(32.759,123.7) ; DD6.19@54.814,82.5 55.806,82.5 56.059,82.754 v1(56.059,83.1) ; DD8.19@54.814,96 55.806,96 56.059,96.254 v1(56.059,96.6) ; DD14.19@54.814,109.4 55.806,109.4 56.059,109.654 v1(56.059,110) ; DD16.19@54.814,123 55.806,123 56.059,123.254 v1(56.059,123.6)
GND: BQ1.2 BQ1.4 C1.2 C2.2 C3.1 C4.1 C5.1 C10.1 C11.1 C12.1 C13.1 C14.1 C15.1 C16.1 C17.1 C18.1 C19.1 C20.1 C21.1 C22.1 C23.1 C24.1 C25.1 C26.1 C27.1 C28.1 C29.1 C30.1 C31.1 C32.1 C33.1 C34.1 C35.1 C36.1 C37.1 C38.1 C39.1 C40.1 C41.1 C42.1 C43.1 C44.1 C45.1 C46.2 C47.2 C48.2 C49.2 C50.1 C53.2 C54.2 C55.1 C56.1 C57.1 C59.1 C60.1 C61.1 C62.1 C62_1.1 C63.1 C64.1 C65.2 C66.2 C67.2 C68.1 C68_1.1 C69.2 C70.2 C71.2 C72.2 C73.1 C74.1 C75.2 C76.2 C77.2 C78.2 C79.2 C81.2 C82.2 D78.D5 D78.E2 D78.E4 D78.E8 D78.E10 D78.G2 D78.G10 D78.J2 D78.J10 D78.L2 D78.L10 D78.N2 D78.N4 D78.N8 D78.N10 D78.P7 DA1.6 DA1.7 DA2.6 DA2.7 DA3.6 DA3.14 DA3.15 DA3.17 DA5.2 DA6.2 DD1.A9 DD1.B1 DD1.B3 DD1.B9 DD1.D1 DD1.D8 DD1.E1 DD1.E2 DD1.E8 DD1.F9 DD1.G1 DD1.G8 DD1.G9 DD1.J2 DD1.J8 DD1.M1 DD1.M9 DD1.P1 DD1.P9 DD1.T1 DD1.T9 DD2.13 DD2.25 DD2.36 DD2.48 DD3.13 DD3.25 DD3.36 DD3.48 DD4.13 DD4.25 DD4.36 DD4.48 DD5.13 DD5.25 DD5.36 DD5.48 DD6.13 DD6.25 DD6.36 DD6.48 DD7.13 DD7.25 DD7.36 DD7.48 DD8.13 DD8.25 DD8.36 DD8.48 DD9.13 DD9.25 DD9.36 DD9.48 DD10.13 DD10.25 DD10.36 DD10.48 DD11.13 DD11.25 DD11.33 DD11.36 DD11.48 DD12.13 DD12.25 DD12.36 DD12.48 DD13.13 DD13.25 DD13.36 DD13.40 DD13.46 DD13.48 DD14.13 DD14.25 DD14.36 DD14.48 DD15.13 DD15.25 DD15.36 DD15.48 DD16.13 DD16.25 DD16.36 DD16.48 DD17.13 DD17.25 DD17.36 DD17.48 DD18.A4 DD18.A7 DD18.B2 DD18.B3 DD18.B5 DD18.B6 DD18.D16 DD18.F2 DD18.F4 DD18.F5 DD18.F12 DD18.F13 DD18.F14 DD18.G2 DD18.G5 DD18.G6 DD18.G7 DD18.G8 DD18.G9 DD18.G10 DD18.G11 DD18.G12 DD18.H6 DD18.H7 DD18.H8 DD18.H9 DD18.H10 DD18.H11 DD18.H12 DD18.J1 DD18.J6 DD18.J7 DD18.J8 DD18.J9 DD18.J10 DD18.J11 DD18.J12 DD18.K6 DD18.K7 DD18.K8 DD18.K9 DD18.K10 DD18.K11 DD18.L5 DD18.L6 DD18.L7 DD18.L8 DD18.L9 DD18.L10 DD18.N1 pad.MH R2.1 R4.1 R13.1 R20.1 R21.2 R27.1 R28.1 R31.1 R32.1 R33.2 R38.1 R40.2 R44.2 S1.1 S1.3 SW2.3 SW2.4 VT1.2 X1.1 X1.4 X1.7 X1.11 X1.12 X1.13 X1.17 X1.19 | length 70.4
  L1:Top w0.15: v1(26.065,47.499) DD18.D16@26.524,47.499 ; D78.J2@30.997,150.993 D78.J2@31.088,150.993 ; D78.G2@31.056,152.993 D78.G2@31.088,152.993 ; DD18.J1@35.717,42.902 v1(36.917,42.902) ; v2(61.784,114.925) DA3.17@62.034,114.675
  L1:Top w0.24: DA3.17@62.034,114.675 DA3.6@63.209,114.675
  L1:Top w0.25: DD18.F14@28.363,47.499 v1(28.363,47.039) DD18.F13@28.822,47.039 ; v1(28.54,41.102) ccw(c28.54,41.642) 28.921,41.26 29.046,41.385 ccw(c28.477,41.954) 29.259,41.764 ccw(c28.477,41.954) 29.282,41.954 DD18.A7@29.282,41.983 DD18.B6@30.201,41.983 DD18.B5@30.661,41.524 ; DD18.F12@29.282,46.579 v1(29.742,46.579) ; DD18.G12@29.742,47.039 v1(29.742,46.579) ; DD18.G11@30.201,46.579 v1(29.742,46.579) ; DD18.H12@30.201,47.499 v1(30.661,47.499) ; v1(30.661,41.064) DD18.A4@30.661,40.604 DD18.B3@31.58,40.604 DD18.B2@32.04,40.145 ; DD18.G10@30.661,46.12 DD18.H10@31.12,46.579 v1(31.12,47.039) DD18.J10@31.58,47.039 DD18.J9@32.04,46.579 ; DD18.H11@30.661,47.039 v1(30.661,47.499) ; DD18.J12@30.661,47.958 v1(30.661,47.499) ; DD18.G9@31.12,45.66 v1(31.58,45.66) ; DD18.J11@31.12,47.499 v1(30.661,47.499) ; DD18.G8@31.58,45.201 v1(31.58,45.66) ; DD18.H9@31.58,46.12 v1(31.58,45.66) ; DD18.K11@31.58,47.958 v1(32.04,47.958) ; DD18.G7@32.04,44.741 DD18.G6@32.499,44.281 v1(32.959,44.281) ; DD18.H8@32.04,45.66 v1(31.58,45.66) ; DD18.K10@32.04,47.499 v1(32.04,47.958) ; DD18.L10@32.499,47.958 v1(32.04,47.958) ; v1(32.499,42.902) DD18.F5@32.499,43.362 ; DD18.H7@32.499,45.201 v1(32.959,45.2) ; DD18.J8@32.499,46.12 DD18.J7@32.959,45.66 v1(32.959,45.2) ; DD18.K9@32.499,47.039 v1(32.959,47.039) ; DD18.G5@32.959,43.822 v1(32.959,44.281) ; DD18.H6@32.959,44.741 v1(32.959,44.281) ; DD18.K8@32.959,46.579 v1(32.959,47.039) ; DD18.L9@32.959,47.499 v1(32.959,47.039) ; DD18.J6@33.419,45.201 v1(32.959,45.2) ; DD18.K7@33.419,46.12 v1(33.878,46.12) ; DD18.L8@33.419,47.039 v1(32.959,47.039) ; DD18.F2@33.878,41.983 v1(34.338,41.983) DD18.G2@34.338,42.443 ; DD18.K6@33.878,45.66 v1(33.878,46.12) ; DD18.L7@33.878,46.579 v1(33.878,46.12) ; DD18.L5@34.797,45.66 DD18.L6@34.338,46.12 v1(33.878,46.12) ; DD18.N1@37.555,44.736 38.158,44.133 ; 38.148,44.123 v1(38.74,44.123)
  L1:Top w0.254: v1(32.499,42.902) DD18.F4@32.959,42.902
  L1:Top w0.3: v1@30.611,155.471 D78.E2@31.078,155.004 ; D78.J2@30.997,150.993 30.369,151.621 30.369,152.306 D78.G2@31.056,152.993 ; D78.N2@31.098,146.982 v1@31.566,146.515 ; D78.J2@31.098,150.982 31.098,150.975 31.58,150.494 v1(31.58,150.486) ; D78.L2@31.099,149.003 v1@31.566,149.47 ; D78.E4@33.088,154.993 34.099,156.003 v1@34.566,156.47 ; D78.N4@33.098,146.982 v1@33.566,146.515 ; D78.P7@36.088,145.993 D78.N8@37.088,146.993 ; v1@36.611,155.471 D78.E8@37.078,155.004 ; D78.N8@37.099,147.003 v1@37.566,147.47 ; D78.N10@39.098,146.982 v1@39.566,146.515 ; D78.J10@39.098,150.982 v1@39.566,150.515 ; D78.G10@39.098,152.982 v1@39.566,152.515 ; D78.E10@39.098,154.982 v1@39.566,154.515 ; D78.L10@39.099,149.003 v1@39.566,149.47
  L8:Bot w0.15: v1@10.469,124.8 10.469,125.8 10.669,126 DD9.36@11.669,126 ; v1(33.074,35.893) v1@33.074,35.905 ; v1@34.094,37.744 v1(34.094,37.756) ; v1(36.917,42.902) 37.505,42.902 C64.1@37.911,42.497 ; C5.1@39.579,35.563 v1@40.011,35.131 ; R13.1@40.273,36.226 40.279,36.226 v1@40.711,35.795 ; C44.1@62.034,118.45 62.034,118.904 62.23,119.1 v1(63.559,119.1) ; R32.1@64.684,114.65 64.684,113.7 R38.1@64.734,113.65 ; C69.2@36.24,42.179 36.255,42.195 C10.1@36.255,43.169 36.566,42.858 36.961,42.858 36.961,42.179 C69.2@36.24,42.179
  L8:Bot w0.2: v1(11.472,39.681) DD1.T9@11.87,40.079 ; v1(11.472,41.281) DD1.P9@11.87,41.679 ; v1(11.472,42.881) DD1.M9@11.87,43.279 ; v1(11.472,46.881) DD1.G9@11.87,47.279 ; v1(11.472,47.681) DD1.F9@11.87,48.079 ; v1(11.472,50.881) DD1.B9@11.87,51.279 ; v1(11.472,51.681) DD1.A9@11.87,52.079 ; v1(12.272,45.281) DD1.J8@12.67,45.679 ; v1(12.272,46.881) DD1.G8@12.67,47.279 ; v1(12.272,48.481) DD1.E8@12.67,48.879 ; v1(12.272,49.281) DD1.D8@12.67,49.679 ; DD1.B3@16.67,51.279 v1(17.069,51.678) ; DD1.J2@17.47,45.679 v1(17.869,45.281) ; DD1.E2@17.47,48.879 DD1.D1@18.27,49.679 18.49,49.679 18.834,50.024 18.834,50.96 18.515,51.279 DD1.B1@18.27,51.279 ; v1(17.872,41.281) DD1.P1@18.27,41.679 ; v1(17.872,42.881) DD1.M1@18.27,43.279 ; v1(17.872,49.278) DD1.E1@18.27,48.879 ; DD1.T1@18.27,40.079 v1(18.669,40.478) ; DD1.G1@18.27,47.279 v1(18.669,46.881)
  L8:Bot w0.3: BQ1.4@33.066,36.453 33.066,35.897 v1@33.074,35.905 ; v1@34.094,37.744 34.102,37.753 BQ1.2@34.102,37.196
  L8:Bot w0.4: C24.1@56.728,100.378 C26.1@57.933,100.378
  other v1: 26.464,10.81 30.262,10.81 33.924,10.81 26.464,13.051 33.924,13.051 26.464,14.813 33.924,14.813 26.699,16.341 33.72,16.341 32.61,18.062 27.134,18.585 25.975,20.127 30.39,20.222 24.584,21.623 28.913,21.719 27.405,23.247 24.074,23.448 27.405,25.273 24.074,26.247 27.365,28.023 24.074,28.866 27.357,30.504 24.074,31.537 27.387,33.405 24.074,34.422 39.946,35.176 28.324,35.541 40.646,35.84 10.684,35.937 25,36.296 30.577,37.695 27.331,38.339 30.038,39.785 28.409,39.972 51.296,41.497 53.933,44.064 14.177,47.143 51.972,50.308 6.021,50.321 58.06,55.509 14.997,59.486 43.443,61.358 47.834,64.353 34.888,66.839 58.601,70.755 4.598,73.544 47.355,76.076 33.112,78.197 66.849,80 65.993,86.908 3.946,87.127 3.946,88.497 62.093,89.401 66.301,90.83 8.502,90.854 7.966,94.982 9.253,94.982 57.361,96.258 29.291,103.889 8.73,104.836 22.777,105.345 8.776,107.344 44.862,108.93 22.466,111.198 66.059,113.2 44.745,115.916 22.497,117.56 8.799,117.585 8.7,121.03 9.441,121.037 68.159,121.507 44.802,122.391 22.531,124.105 59.848,124.626 10.459,124.8 50.188,132.162 59.658,133.637 15.012,133.787 22.739,133.909 9.892,134.702 46.224,139.234 23.296,139.345 51.915,140.859 14.923,142.481 48.752,144.18 31.581,146.485 33.581,146.485 39.581,146.485 13.597,146.595 37.596,147.485 31.596,149.485 39.596,149.485 39.581,150.485 39.581,152.485 39.581,154.485 30.596,155.501 36.596,155.501 34.596,156.485
  other v2: 62.284,97.975 64.684,117.65
INTRQ: 
IORDY: 
LDO_1V8: C79.1 DA6.3 R50.1 | length 2.6
  L1:Top w0.6: DA6.3@63.459,84.05 C79.1@65.015,84.05 R50.1@66.059,84.05
nCE1_FLASH: D78.H8 R46.2 R47.2 | length 23.7
  L1:Top w0.1: v1(36.621,152.511) D78.H8@37.088,152.044
  L6:Sig w0.1: v1(27.682,137.594) 29.445,139.357 ccw(c28.982,139.819) 29.637,139.819 29.637,149.922 cw(c30.004,149.922) 29.744,150.182 32.348,152.786 cw(c32.959,152.175) 32.959,153.039 35.96,153.039 cw(c35.96,152.717) 36.187,152.945 v1(36.621,152.511)
  L8:Bot w0.1: R46.2@26.823,137.006 R47.2@27.682,137.006 v1(27.682,137.594)
nCE3_FLASH: D78.H7 R48.2 R51.2 | length 21.5
  L1:Top w0.1: v1(35.621,152.511) D78.H7@36.088,152.044
  L6:Sig w0.1: v1(28.914,137.594) 29.757,138.436 ccw(c29.261,138.931) 29.962,138.931 29.962,149.782 cw(c30.449,149.782) 30.104,150.126 31.832,151.853 cw(c32.093,151.592) 32.093,151.962 34.797,151.962 ccw(c34.797,152.599) 35.247,152.148 35.61,152.511 v1(35.621,152.511)
  L8:Bot w0.1: v1(28.914,137.594) R51.2@28.914,137.006 R48.2@29.774,137.006
NetBQ1_3: BQ1.3 C4.2 R18.1 | length 1.8
  L8:Bot w0.15: BQ1.3@34.222,36.376 C4.2@35.046,36.376 ; C4.2@35.079,36.293 C4.2@35.17,36.293 ; C4.2@35.17,36.243 35.177,36.249 R18.1@35.177,37.082
NetC6_1: C6.1 X1.2 | length 3.4
  L1:Top w0.1: X1.2@27.654,8.098 27.654,8.573 cw(c28.38,8.573) 27.867,9.086 28.079,9.298 28.08,9.298 ccw(c27.939,9.44) 28.139,9.44 28.139,10.612 ; C6.1@27.892,11.288 ccw(c28.04,11.288) 27.935,11.184 cw(c27.442,10.691) 28.14,10.691 28.14,10.612
NetC6_2: 
NetC7_1: C7.1 X1.5 | length 3.4
  L1:Top w0.1: X1.5@31.464,8.098 31.464,8.573 cw(c32.19,8.573) 31.677,9.086 31.889,9.298 31.89,9.298 ccw(c31.749,9.44) 31.949,9.44 31.949,10.719 ccw(c31.319,10.719) 31.764,11.164 31.741,11.188 cw(c31.841,11.288) C7.1@31.699,11.288
NetC7_2: 
NetC8_1: C8.1 X1.3 | length 3.4
  L1:Top w0.1: 28.439,10.612 28.439,9.44 ccw(c28.639,9.44) 28.498,9.298 28.499,9.298 28.712,9.086 cw(c28.199,8.573) 28.924,8.573 X1.3@28.924,8.098 ; 28.44,10.612 28.44,10.691 cw(c29.137,10.691) 28.644,11.184 ccw(c28.54,11.288) C8.1@28.687,11.288
NetC8_2: 
NetC9_1: C9.1 X1.6 | length 3.4
  L1:Top w0.1: 32.249,10.719 32.249,9.44 ccw(c32.449,9.44) 32.308,9.298 32.309,9.298 32.522,9.086 cw(c32.009,8.573) 32.734,8.573 X1.6@32.734,8.098 ; 32.249,10.719 cw(c32.88,10.719) 32.434,11.164 32.458,11.188 ccw(c32.358,11.288) C9.1@32.499,11.288
NetC9_2: 
NetC43_2: C43.2 DA2.4 R30.1 | length 1.5
  L1:Top w0.35: DA2.4@62.934,98.775 R30.1@62.934,99.575
  L1:Top w0.4: R30.1@62.934,99.575 C43.2@63.634,99.575
NetC44_2: C44.2 DA1.4 R29.1 R31.2 | length 2.6
  L8:Bot w0.4: R29.1@62.134,117.55 R31.2@63.032,117.55 63.034,117.552 C44.2@63.034,118.45 63.859,118.45
NetC48_1: C48.1 DA3.10 R34.2 | length 1.9
  L1:Top w0.24: DA3.10@62.009,116.525 C48.1@62.009,117.286
  L1:Top w0.25: C48.1@62.009,117.286 62.148,117.425 C48.1@62.184,117.425
  L1:Top w0.5: C48.1@62.184,117.425 R34.2@62.184,118.325
NetC49_1: C49.1 DA3.13 R35.2 | length 2.5
  L1:Top w0.5: 60.359,115.825 R35.2@60.359,118.325
NetC51_2: C51.2 DA1.3 R36.2 R37.1 R38.2 | length 4.3
  L8:Bot w0.35: C51.2@63.734,115.65 64.034,115.95 DA1.3@64.034,116.85
  L8:Bot w0.45: R36.2@63.734,112.65 R38.2@63.734,113.65 R37.1@63.734,114.65 C51.2@63.734,115.65
NetC52_1: C52.1 DA2.3 R39.2 R40.1 | length 2.5
  L1:Top w0.35: R40.1@62.934,96.4 DA2.3@62.934,97.175
  L1:Top w0.4: R40.1@62.934,96.4 R40.1@62.959,96.375 R39.2@63.909,96.375 C52.1@63.909,97.15
NetC52_2: C52.2 C55.2 C57.2 L2.2 R39.1 R42.1 | length 10.9
  L1:Top w0.4: L2.2@60.484,94 64.459,94 64.909,94.45 R39.1@64.909,96.375 C52.2@64.909,97.15 64.909,98.05 C57.2@65.059,98.2 R42.1@65.059,100.65
NetC53_1: C53.1 DA3.9 | length 1.7
  L1:Top w0.5: 62.639,116.325 C53.1@64.384,116.325
NetC58_2: C58.2 DA3.5 R43.1 R44.1 | length 3.2
  L1:Top w0.24: DA3.5@63.209,114.175 C58.2@64.384,114.175
  L1:Top w0.5: C58.2@64.384,114.175 R43.1@65.184,114.175 R44.1@65.184,115.425
NetC62_2: 
NetC80_1: 
NetC84_2: 
NetC85_1: 
NetC86_1: 
NetC88_1: 
NetC89_1: 
NetDA1_1: DA1.1 L1.1 | length 2.1
  L8:Bot w0.35: DA1.1@65.334,116.85 65.934,116.25 L1.1@65.934,114.95
NetDA1_2: DA1.2 R32.2 | length 1.2
  L8:Bot w0.35: R32.2@64.684,115.65 DA1.2@64.684,116.85
NetDA2_1: DA2.1 L2.1 | length 2.3
  L1:Top w0.4: L2.1@60.484,95.7 60.484,96.882 60.777,97.175 61.459,97.175
NetDA2_2: DA2.2 R33.1 | length 0.8
  L1:Top w0.35: R33.1@62.284,96.425 DA2.2@62.284,97.175
  L1:Top w0.4: R33.1@62.234,96.375 R33.1@62.284,96.425
NetDA3_1: DA3.1 DA3.2 L3.1
NetDA3_4: DA3.4 R41.1 | length 1.3
  L1:Top w0.24: DA3.4@62.509,113.5 62.509,112.25 R41.1@62.534,112.225
NetDA4_1: 
NetDA4_3: 
NetDD1_L8: DD1.L8 R2.2 | length 3.5
  L8:Bot w0.1: R2.2@9.319,43.688 12.279,43.688 DD1.L8@12.67,44.079
NetDD18_A16: DD18.A16 R27.2 | length 1.9
  L1:Top w0.1: v1(24.686,46.12) DD18.A16@25.145,46.12
  L8:Bot w0.2: R27.2@23.695,45.129 v1(24.686,46.12)
NetDD18_B1: DD18.B1 R28.2 | length 1.3
  L1:Top w0.1: v1(32.499,39.225) DD18.B1@32.499,39.685
  L8:Bot w0.1: R28.2@31.854,39.784 31.941,39.784 v1(32.499,39.225)
NetDD19_26: 
NetR7_1: 
NetR17_1: X1.18
NetR23_1: R23.1 VD2.2 | length 1.5
  L1:Top w0.2: VD2.2@50.249,17.674 R23.1@50.249,19.14
NetR24_1: R24.1 VD3.2 | length 1.5
  L1:Top w0.2: VD3.2@48.53,17.674 R24.1@48.53,19.14
NetR36_1: R36.1 VT1.3 | length 1.9
  L8:Bot w0.5: R36.1@63.734,111.65 65.234,111.65 VT1.3@65.534,111.35
NetR84_1: 
NetX1_20: X1.20 X1.21 X1.22 | length 2.5
  L1:Top w0.2: X1.20@55.594,8.098 X1.21@56.864,8.098 X1.22@58.134,8.098
ODT_0: DD1.K1 DD18.D15 | length 24
  L1:Top w0.1: v1(26.524,47.039) DD18.D15@26.984,47.039
  L5:Sig w0.1: v1(18.927,42.954) 20.968,44.995 21.003,45.031 ccw(c20.862,45.172) 21.003,45.314 20.338,45.978 cw(c20.48,46.12) 20.338,46.261 cw(c20.48,46.12) 20.621,46.261 21.696,45.186 ccw(c21.837,45.328) 21.979,45.186 ccw(c21.837,45.328) 21.979,45.469 20.904,46.544 cw(c21.045,46.685) 20.904,46.827 cw(c21.045,46.685) 21.187,46.827 22.262,45.752 ccw(c22.403,45.894) 22.545,45.752 ccw(c22.403,45.894) 22.545,46.035 21.47,47.11 cw(c21.611,47.251) 21.47,47.393 cw(c21.611,47.251) 21.753,47.393 22.417,46.728 ccw(c22.559,46.869) 22.7,46.728 23.035,47.063 23.321,47.349 cw(c23.683,46.986) 23.683,47.499 23.838,47.499 23.888,47.499 ccw(c23.888,47.699) 24.088,47.699 24.088,48.01 cw(c24.288,48.01) 24.488,48.01 24.488,47.068 ccw(c24.688,47.068) 24.888,47.068 24.888,47.299 cw(c25.088,47.299) 25.088,47.499 25.39,47.499 cw(c25.39,46.979) 25.757,47.346 25.902,47.202 ; 25.902,47.201 ccw(c26.294,47.594) 26.294,47.039 v1(26.524,47.039)
  L8:Bot w0.1: DD1.K1@18.27,44.879 18.598,44.879 cw(c18.598,44.551) 18.927,44.551 v1(18.927,42.954)
P01: DD18.K5 R16.1 | length 12
  L1:Top w0.1: DD18.K5@34.338,45.201 34.58,45.201 cw(c34.58,44.675) 34.951,45.047 35.022,44.976 ; 35.022,44.976 ccw(c35.257,45.212) 35.257,44.879 ccw(c35.257,45.211) 35.492,44.976 35.508,44.992 cw(c35.718,44.782) 35.718,45.079 cw(c35.718,44.753) 35.948,44.984 ; 35.949,44.984 37.695,43.237 cw(c36.731,42.273) 38.095,42.273 38.095,36.975 38.095,36.308 v1(38.093,36.306)
  L8:Bot w0.1: R16.1@38.068,35.72 ccw(c38.278,35.72) R16.1@38.13,35.572 ; R16.1@38.093,35.72 v1(38.093,36.306)
P10: DD18.R1 VD2.1 | length 39.8
  L1:Top w0.2: DD18.R1@38.474,45.66 39.04,45.095 ccw(c40.405,46.46) 40.405,44.529 42.967,44.529 cw(c42.967,42.542) 44.372,43.947 52.336,35.983 cw(c50.54,34.187) 53.08,34.187 53.08,17.428 51.826,16.174 VD2.1@50.249,16.174
P11: DD18.H5 S1.2 | length 82
  L1:Top w0.1: v1(33.419,43.822) DD18.H5@33.419,44.281
  L3:Sig w0.15: v1(33.419,43.822) 33.419,42.976 33.784,42.611 36.121,42.611 39.491,39.24 44.672,39.24 60.292,54.86 60.292,73.321 64.059,77.089 64.059,94 66.549,96.49 v1(66.549,96.8)
  L8:Bot w0.15: v1(66.549,96.8) S1.2@66.549,98.05
P14: C10.2 DD18.K2 R22.2 VD1.2 | length 4.9
  L1:Top w0.1: DD18.K2@35.717,43.822 v1(35.717,44.281)
  L8:Bot w0.1: v1(35.717,44.281) 36.143,44.281 C10.2@36.255,44.169
  L8:Bot w0.15: C10.2@36.255,44.169 37.05,44.169 37.603,43.616 R22.2@37.911,43.616 38.352,43.616 38.605,43.616 39.115,43.106 39.115,42.76 VD1.2@39.24,42.635
P15: DD18.J5 S1.4 VD3.1 | length 105.9
  L1:Top w0.1: v1(33.878,44.281) DD18.J5@33.878,44.741 ; v1@47.586,16.155 VD3.1@48.243,16.155 ; VD3.1@48.492,16.164 VD3.1@48.53,16.202
  L6:Sig w0.15: v1@33.878,44.279 34.492,44.279 36.363,42.407 38.765,42.407 ; v1(47.568,16.147) 39.509,24.205 cw(c41.305,26.001) 38.765,26.001 38.765,42.407 ; v1(65.759,96.6) 61.102,91.943 61.102,60.833 42.676,42.407 41.881,42.407 38.765,42.407
  L8:Bot w0.15: S1.4@65.279,98.05 65.279,97.08 v1(65.759,96.6)
P20: DD18.G3 R12.1 | length 6.3
  L1:Top w0.1: DD18.G3@33.878,42.902 34.193,42.902 cw(c34.193,42.603) 34.404,42.815 ; 34.404,42.815 35.725,41.494 cw(c34.762,40.531) 36.124,40.531 36.124,39.659 ccw(c37.574,39.659) v1(36.549,38.634)
  L8:Bot w0.1: v1(36.549,38.634) 36.549,38.625 37.015,38.159 R12.1@37.015,38.045
P23: DD18.H3 R19.1 | length 6.2
  L1:Top w0.1: DD18.H3@34.338,43.362 34.586,43.362 cw(c34.586,42.815) 34.973,43.202 ; 34.973,43.202 36.437,41.738 cw(c35.457,40.758) 36.843,40.758 36.843,40.023 ccw(c37.503,40.023) 37.036,39.557 v1@37.269,39.324
  L8:Bot w0.1: v1(37.263,39.318) 37.746,38.835 R19.1@37.801,38.835